# Altium PCB OpenRex_V1I1_PCB.PcbDoc (part 4 of 12)
Units mm, origin at the board's own origin, x right, y up, seen from the top; angles counter-clockwise.
Board outline 70 x 95 mm, 10 copper layers (L1, L2, L3, L4 (PWR), L5 (PWR), L6 (PWR), L7 (PWR), L8, L9, L10), stack 1.632 mm thick; 1080 components, 708 nets, 3831 pads, 2373 vias.
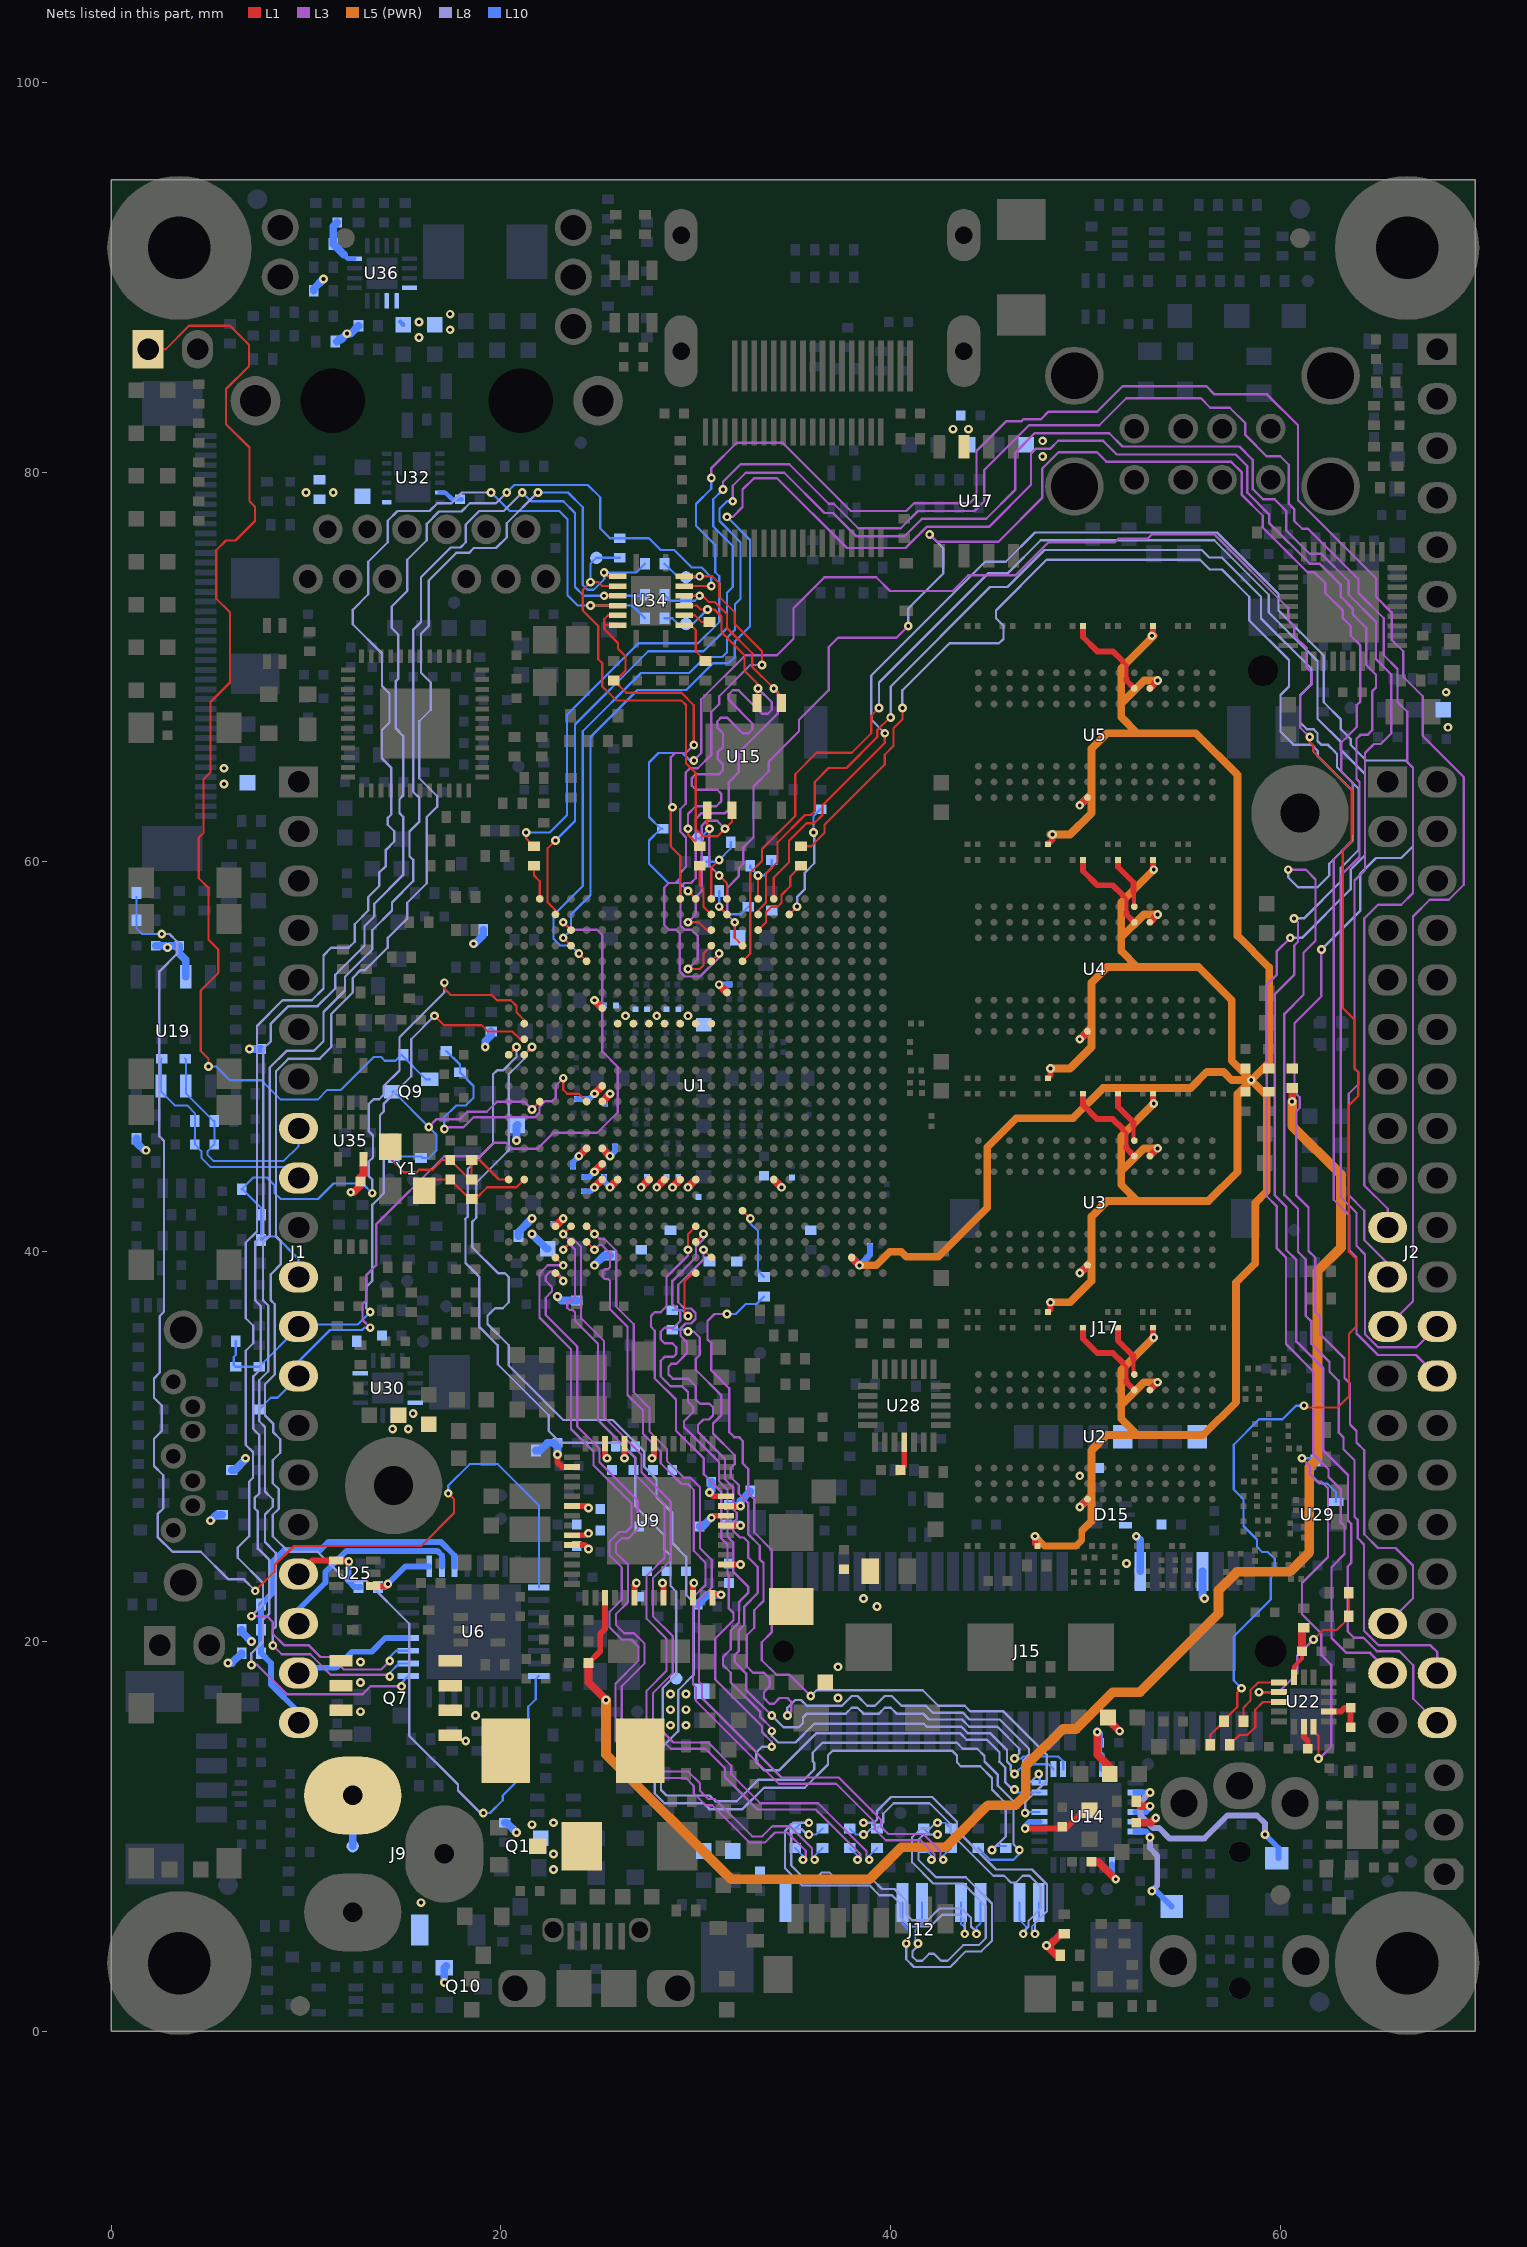
[diagram p12: the nets of this part, all layers, seen from the top]

## Via types
v1: diameter 0.45, hole 0.2, L1 to L10, tented both sides, 2369 vias
v2: diameter 1, hole 0.5, L1 to L10, tented top, 4 vias

## Nets (pads, with @x,y where several pads share a name; then routed paths per layer and width w, separated by ;. In a path a pad name is that pad's centre, name@x,y a point inside that pad or via, vN(x,y) a via of type N, cw(c..) or ccw(c..) an arc to the next point about the centre after c; other vN are vias at no path point) (continued)
+DDR_VREF: C3.1 C4.1 C5.1 C6.1 C7.1 C8.1 C9.1 C10.1 C11.1 C392.2 C393.1 R245.1 R274.2 R345.1 U1.AC2 U2.H1 U2.M8 U3.H1 U3.M8 U4.H1 U4.M8 U5.H1 U5.M8 | length 176.8
  L1 w0.3: v1(47.4,25.4) 47.4,25.035 C4.1@47.535,24.9 ; C5.1@48.065,36.9 48.2,37.035 v1(48.2,37.4) ; C8.1@48.065,48.9 48.2,49.035 v1(48.2,49.4) ; C10.1@48.065,60.9 48.3,61.135 v1(48.3,61.4) ; v1(53.4,71.6) 53.465,71.665 C11.1@53.465,72.1 ; C3.1@53.465,36.1 53.465,35.635 v1(53.5,35.6) ; C6.1@53.465,48.1 53.465,47.635 v1(53.5,47.6) ; C9.1@53.465,60.1 53.465,59.635 v1(53.5,59.6)
  L1 w0.35: v1(49.7,26.9) U2.H1@50.1,27.3 ; v1(49.7,38.9) U3.H1@50.1,39.3 ; v1(49.7,50.9) U4.H1@50.1,51.3 ; v1(49.7,62.9) U5.H1@50.1,63.3 ; U2.M8@53.3,32.9 v1(53.7,33.3) ; U3.M8@53.3,44.9 v1(53.7,45.3) ; U4.M8@53.3,56.9 v1(53.7,57.3) ; U5.M8@53.3,68.9 v1(53.7,69.3)
  L1 w0.4: U1.AC2@38,39.7 v1(38.4,39.3)
  L5 (PWR) w0.35: v1(47.4,25.4) 47.9,24.9 49.507,24.9 49.8,25.193 49.8,25.675 49.825,25.7
  L5 (PWR) w0.4: v1(38.4,39.3) 39.258,39.3 39.958,40 40.54,40 40.8,39.74 42.44,39.74 44.96,42.26 44.96,45.36 46.45,46.85 49.35,46.85 50.9,48.4 55.4,48.4 56.225,49.225 57.075,49.225 57.5,48.8 v1(58.5,48.8) ; v1(48.2,37.4) 49.2,37.4 50.3,38.5 50.3,39.5 ; v1(48.2,49.4) 49.2,49.4 50.3,50.5 50.3,51.5 ; v1@48.2,61.4 49.2,61.4 50.3,62.5 50.3,63.5 ; v1(49.7,26.9) 50.3,27.5 ; v1(49.7,38.9) 50.3,39.5 ; v1(49.7,50.9) 50.3,51.5 ; v1(49.7,62.9) 50.3,63.5 ; 49.825,25.7 50.3,26.175 50.3,27.5 ; v1(53.5,35.6) 51.825,33.925 51.825,32.125 ; v1(53.5,47.6) 51.825,45.925 51.825,44.125 ; v1(53.5,59.6) 51.825,57.925 51.825,56.125 ; v1@53.5,71.6 51.825,69.925 51.825,68.125 ; v1(53.7,33.3) 53,33.3 51.825,32.125 ; v1(53.7,45.3) 53,45.3 51.825,44.125 ; v1(53.7,57.3) 53,57.3 51.825,56.125 ; v1@53.7,69.3 53,69.3 51.825,68.125 ; 50.3,27.5 50.3,29.8 51.1,30.6 52.658,30.6 ; 50.3,39.5 50.3,41.8 51.1,42.6 52.658,42.6 ; 50.3,51.5 50.3,53.8 51.1,54.6 52.658,54.6 ; 50.3,63.5 50.3,65.8 51.1,66.6 52.658,66.6 ; 51.825,32.125 51.825,31.433 52.658,30.6 ; 51.825,44.125 51.825,43.433 52.658,42.6 ; 51.825,56.125 51.825,55.433 52.658,54.6 ; 51.825,68.125 51.825,67.433 52.658,66.6 ; 52.658,30.6 56.042,30.6 57.725,32.283 57.725,38.425 58.7,39.4 58.7,42.5 59.3,43.1 59.3,48 v1(58.5,48.8) ; 52.658,42.6 56.3,42.6 57.8,44.1 57.8,48.1 v1(58.5,48.8) ; 52.658,54.6 55.8,54.6 57.5,52.9 57.5,49.8 v1(58.5,48.8) ; 52.658,66.6 55.658,66.6 57.8,64.458 57.8,56.2 59.425,54.575 59.425,49.725 v1(58.5,48.8)
  L10 w0.3: v1(38.4,39.3) 38.935,39.835 C7.1@38.935,40.3
+DDR_VREF_PMIC: C339.1 R345.2 U9.31 | length 81.6
  L1 w0.3: C339.1@24.5,18.9 25.1,19.5 25.1,20.4 25.35,20.65 U9.31@25.35,22.25
  L1 w0.4: C339.1@24.5,18.9 24.5,17.9 v1(25.4,17) ; v1(60.6,47.7) R345.2@60.6,48.4
  L5 (PWR) w0.5: v1(25.4,17) 25.4,14.2 31.8,7.8 38.913,7.8 40.557,9.443 42.843,9.443 45,11.6 46.4,11.6 46.925,12.125 46.925,13.606 48.834,15.515 49.515,15.515 51.4,17.4 52.8,17.4 56.825,21.425 56.825,22.625 57.775,23.575 60.475,23.575 61.475,24.575 61.475,28.962 61.9,29.387 61.9,39 63.1,40.2 63.1,43.95 60.6,46.45 v1(60.6,47.7)
+GYRO_VREGD: C403.1 U28.16 | length 1.5
  L1 w0.3: C403.1@40.5,28.8 40.7,29 U28.16@40.7,30.225
+HDMI_VP: C76.1 R27.2 U1.L7 | length 0.6
  L1 w0.4: v1(28,43.3) U1.L7@28.4,43.7
+HDMI_VPH: C77.1 R29.2 U1.M7 | length 0.6
  L1 w0.4: v1(28.8,43.3) U1.M7@29.2,43.7
+LVDS_2V5: C79.1 C208.1 R36.2 U1.V7 | length 0.6
  L1 w0.4: U1.V7@34,43.7 v1(34.4,43.3)
+MPCIE_SIM_PWR: C218.1 D15.3 J15.8 J17.C1 | length 1.4
  L10 w0.4: J15.8@56,23.6 56,22.3 v1(56.1,22.2)
  other v1: 52.1,24
+MPCIE_SIM_VPP: C383.1 J15.16 J17.C6 | length 1.9
  L10 w0.4: v1(52.6,25.4) 52.8,25.2 J15.16@52.8,23.6
  other v1: 49.7,28.5
+NVCC_CSI: C145.1 R76.1 U1.N7 | length 0.6
  L1 w0.4: v1(29.6,43.3) U1.N7@30,43.7
+NVCC_ENET: C155.1 C156.1 R74.1 U1.R19 | length 1.1
  L1 w0.4: v1(31.2,53.7) U1.R19@31.6,53.3
  L10 w0.3: v1(31.2,53.7) C155.1@31.735,53.7
+NVCC_MIPI: C149.1 R78.1 U1.K7 | length 0.6
  L1 w0.4: v1(27.2,43.3) U1.K7@27.6,43.7
+NVCC_RGMII: C152.1 R80.1 U1.G18 | length 2.1
  L1 w0.4: v1(24.8,52.9) U1.G18@25.2,52.5
  L10 w0.3: v1(24.8,52.9) 25.065,52.635 C152.1@25.3,52.635
  L10 w0.4: v1(18.6,55.8) 18.658,55.8 19.1,56.242 R80.1@19.1,56.5
+PCIE_VP: C61.1 R13.2 U1.H7 | length 2.3
  L1 w0.4: v1(25.6,43.3) U1.H7@26,43.7
  L10 w0.3: C61.1@25.3,43.835 25.3,43.6 v1(25.6,43.3)
  L10 w0.4: v1(22.9,37.7) 23.1,37.5 R13.2@23.9,37.5
+PCIE_VPH: C64.1 R14.2 U1.G7 | length 2.4
  L1 w0.4: v1(24.8,43.3) U1.G7@25.2,43.7
  L10 w0.3: C64.1@24.265,43.1 24.6,43.1 v1(24.8,43.3)
  L10 w0.4: R14.2@20.9,40.8 20.9,41 v1(21.6,41.7)
+PCIE_VPTX: C62.1 FB1.2 U1.G8 | length 2.3
  L1 w0.4: v1(24.8,44.1) U1.G8@25.2,44.5
  L10 w0.3: C62.1@24.3,43.835 24.535,43.835 v1(24.8,44.1)
  L10 w0.4: v1(21.6,40.9) 22.35,40.15 FB1.2@22.4,40.15
+PMIC_LICELL: C341.1 U9.42 | length 1.9
  L1 w0.3: U9.42@30.85,22.25 31,22.4 v1(31.3,22.4)
  L10 w0.4: C341.1@30.1,21.9 30.6,22.4 v1(31.3,22.4)
+PMIC_VCORE: C379.1 U9.49 | length 1.5
  L1 w0.3: U9.49@31.55,25.95 v1(32.3,25.95)
  L10 w0.4: C379.1@31.6,26 32.25,26 v1(32.3,25.95)
+PMIC_VCOREREF: C378.1 U9.52 | length 1.5
  L1 w0.3: v1(30.7,27.65) 30.9,27.45 U9.52@31.55,27.45
  L10 w0.4: v1(30.7,27.65) 30.8,27.75 C378.1@30.8,28.2
+PWRON_1V375_OPT: C331.1 R341.2 U9.16 | length 3.1
  L1 w0.3: v1(22.9,29.6) 22.9,29.2 23.15,28.95 U9.16@23.65,28.95
  L10 w0.4: R341.2@21.8,29.8 22,29.8 22.4,30.2 C331.1@22.9,30.2 v1(22.9,29.6)
+SATA_VP: C81.1 R18.2 U1.G13 | length 2.6
  L1 w0.4: v1(24.8,48.1) U1.G13@25.2,48.5
  L10 w0.3: C81.1@23.9,47.835 24.535,47.835 v1(24.8,48.1)
  L10 w0.4: v1(24.8,39.3) 25.3,39.8 R18.2@25.6,39.8
+SATA_VPH: C82.1 R19.2 U1.G12 | length 2.1
  L1 w0.4: U1.G12@25.2,47.7 v1(25.6,48.1)
  L10 w0.3: C82.1@25.335,47.6 25.335,47.835 v1(25.6,48.1)
  L10 w0.4: v1(19.2,50.5) 19.2,50.8 19.5,51.1 R19.2@19.5,51.3
+V_INPUT: J9.1 Q7.1 Q7.2 Q7.3 Q10.2 R100.2 R292.2 TP39.1 | length 4.3
  L10 w0.4: TP39.1@12.4,9.5 J9.1@12.4,12.1 ; v1(17.1,2.5) Q10.2@17.1,3.25 Q10.2@17.2,3.35 ; R292.2@20.2,10.7 20.3,10.7 v1(20.8,10.2)
  other v1: 15.9,6.6 12.8,16.4 12.8,17.9 12.8,18.95
+VCC_CAN: C309.2 C397.1 C423.1 FB43.2 FB44.2 R382.2 U19.3 U35.5 | length 6.5
  L1 w0.4: v1(12.3,43.05) 12.45,43.05 12.785,43.385 12.785,43.8 12.95,43.965 U35.5@12.95,44.75
  L10 w0.4: R382.2@1.3,45.8 1.3,45.6 1.7,45.2 v1(1.8,45.2) ; C397.1@2.3,55.7 2.8,55.7 v1(2.9,55.6) 3,55.7 C309.2@3.5,55.7 3.5,55.3 3.835,54.965 U19.3@3.835,54.1 ; v1(7.1,50.4) FB44.2@7.7,50.4
+VCOREDIG: C377.1 R261.2 U9.51 | length 2.3
  L1 w0.3: U9.51@31.55,26.95 v1(32.3,26.95)
  L10 w0.4: C377.1@31.7,26.95 v1(32.3,26.95) 32.3,27.2 R261.2@32.8,27.7
+VDD_CSI: C278.1 C279.1 FB14.2 J12.15 R52.2 R53.2 | length 2.1
  L1 w0.4: R53.2@48.7,3.9 48.5,3.9 v1(48,4.4) 48.142,4.4 48.725,4.983 48.725,5 R52.2@48.9,5
+VDD_SNVS_CAP: C143.1 U1.G9 | length 1.2
  L1 w0.4: U1.G9@25.2,45.3 v1(25.6,44.9)
  L10 w0.3: v1(25.6,44.9) 25.865,45.165 C143.1@25.865,45.4
+VDDA: C283.1 FB13.1 FB26.1 U14.5 | length 3.2
  L1 w0.4: FB26.1@51.15,16.1 51.15,16 v1(51.75,15.4) ; C283.1@52.6,10.7 53.35,10.7 v1(53.6,10.95)
  L10 w0.3: U14.5@52.55,10.75 U14.5@52.56,10.75 53.4,10.75 v1(53.6,10.95)
+VDDD: C282.1 FB11.1 FB20.2 U14.30 | length 4.4
  L1 w0.4: v1(50.6,15.35) 50.6,14.2 51.25,13.55 FB20.2@51.25,13.2
  L10 w0.3: C282.1@50.7,14.7 50.7,14.3 50.85,14.15 U14.30@50.85,13.46 U14.30@50.85,13.45
  L10 w0.4: v1(50.6,15.35) 50.7,15.25 C282.1@50.7,14.8 C282.1@50.7,14.7
+VDDIO: C281.1 FB12.2 U14.20 | length 4.7
  L1 w0.3: v1(46.9,10.4) 49,10.4 49.95,11.35 FB12.2@50.2,11.35
  L10 w0.3: v1(46.9,10.4) 46.9,10.528 47.122,10.75 U14.20@47.65,10.75
+VDDPU: C130.1 C131.1 C132.1 C133.1 C134.1 C135.1 U1.H17 U1.J17 U1.K17 U1.L17 U1.M17 U1.N17 U1.P17
  other v1: 26.4,52.1 28,52.1 29.6,52.1
+VDDUSB: C68.1 C80.1 U1.F9 | length 2
  L1 w0.4: v1(24,44.9) U1.F9@24.4,45.3
  L10 w0.3: C68.1@23.7,44.365 23.7,44.6 v1(24,44.9)
  L10 w0.4: v1(20.8,45.7) 20.8,46.45 C80.1@20.85,46.5
+VIN_4V2: C335.1 C344.1 C345.1 C346.1 C347.1 C348.1 C349.1 C350.1 C351.1 C367.1 C368.1 C369.1 C370.1 C371.1 C372.1 C373.1 C374.1 C375.1 C381.1 C406.1 C407.1 C427.1 C428.1 C435.1 C436.1 D9.1 L11.1 R203.2 R334.2 R335.2 R354.1 R397.2 R398.2 R403.1 TP38.1 U9.7 U9.10 U9.12 U9.20 U9.23 U9.24 U9.34 U9.37 U9.40 U9.45 U9.50 U30.1 U30.2 U30.16 U36.1 U36.2 U36.16 | length 14.8
  L1 w0.3: U9.24@23.65,24.95 24.3,24.95 v1(24.5,24.75) ; U9.23@23.65,25.45 24.4,25.45 v1(24.5,25.55) ; U9.20@23.75,26.95 24.4,26.95 v1(24.5,26.85) ; U9.12@25.35,30.15 25.35,29.5 v1(25.45,29.4) ; v1(26.35,29.4) U9.10@26.35,30.15 ; U9.34@26.85,22.25 26.85,22.9 v1(26.95,23) ; v1(27.75,29.4) 27.85,29.5 U9.7@27.85,30.15 ; v1(28.3,23) 28.35,22.95 U9.37@28.35,22.25 ; U9.40@29.85,22.25 29.85,22.95 v1(29.9,23) ; v1(30.8,26.35) 30.9,26.45 U9.50@31.55,26.45 ; U9.45@31.55,23.95 v1(32.3,23.95)
  L10 w0.23: C427.1@14.85,87.7 C427.1@15,87.55
  L10 w0.4: v1(5.1,26.2) 5.4,26.5 R335.2@5.7,26.5 ; v1(6,18.9) 6.2,18.9 R203.2@6.7,19.4 R203.2@6.7,19.3 ; R334.2@6.2,28.8 6.358,28.8 6.9,29.342 v1(6.9,29.4) ; R397.2@10.4,89.3 10.4,89.4 v1(10.9,89.9) ; R403.1@11.6,86.7 11.7,86.8 11.8,86.8 v1(12.1,87.1) 12.3,87.1 R398.2@12.7,87.5 ; C375.1@30.2,25.9 30.35,25.9 v1(30.8,26.35)
  other v1: 28.7,15.7 29.5,15.7 28.7,16.5 29.5,16.5 28.7,17.3 29.5,17.3 39.3,21.8 38.6,22.2 14.45,30.9 15.25,30.9 15.5,31.7 10,78.95 11.4,78.95 15.8,86.9 17.4,87.3 15.8,87.7 17.4,88.1
+VIN_5V: C88.1 C252.1 D9.2 FB2.1 FB23.1 FB24.2 FB31.2 FB34.2 FB37.1 Q1.3 Q7.5 Q7.6 Q7.7 Q7.8 R365.2 U17.7 | length 0.9
  L1 w0.4: Q1.3@21.9,9.4 Q1.3@21.9,9.5
  L10 w0.4: R365.2@6.7,20.6 6.7,20.5 v1(7.2,20)
  other v1: 22.7,8.3 22.7,9.1 21.6,10.6 22.7,10.7 18.2,14.9 18.7,16.2 37.3,17.1 37.3,18.7 5.8,64 5.8,64.8 68.6,66.9 68.5,68.7 47.8,80.8 47.8,81.6 43.2,82.2 44,82.2
+VIN_ETH: C239.1 R354.2 R355.2 U32.1
ANALOG_IN_0: J1.17 R282.2 U25.1 | length 4.7
  L1 w0.3: J1.17@9.62,23.46 10.31,24.15 v1@12.25,24.15
  L10 w0.3: v1(12.2,24.1) 12.2,24.049 12.18,24.029 12.18,23.1 12.48,22.8 R282.2@12.8,22.8
ANALOG_IN_0_SW: R282.1 U6.25 U25.4 | length 3.8
  L1 w0.3: U25.4@13.45,22.85 v1@14.15,22.85
  L10 w0.3: R282.1@13.7,22.8 14.05,22.8 v1(14.2,22.95) 15.1,23.85 U6.25@16.325,23.85
ANALOG_IN_1: J1.18 U6.26 | length 10.3
  L10 w0.3: J1.18@9.62,20.92 9.62,21.641 11,23.021 11,23.572 12.078,24.65 16.732,24.65 16.975,24.407 U6.26@16.975,23.85
ANALOG_IN_2: J1.19 U6.20 | length 6.4
  L10 w0.3: J1.19@9.62,18.38 9.89,18.65 11.55,18.65 12.375,19.475 13.375,19.475 14.075,20.175 U6.20@15.25,20.175
ANALOG_IN_3: J1.20 R203.1 R239.2 R365.1 U6.27 | length 19.9
  L10 w0.3: J1.20@9.62,15.84 9.62,16.38 8.2,17.8 8.2,18.9 R203.1@7.7,19.4 R365.1@7.7,20.6 R239.2@7.7,21.9 8.3,22.5 8.3,24.1 8.9,24.7 10.749,24.7 11.159,25.11 16.922,25.11 17.625,24.407 U6.27@17.625,23.85
AUD3_CLK: R206.2 U14.21 | length 43.6
  L3 w0.12: v1(31.6,36.8) 30.956,36.8 30.6,36.444 30.6,35.5 30.8,35.3 30.8,33.9 31.715,32.985 31.715,30.741 31.971,30.485 32.215,30.485 32.415,30.285 32.415,29.129 32.685,28.859 32.685,27.615 33,27.3 33,25.6 33.89,24.71 33.89,20.46 33.39,19.96 33.39,19.04 34.13,18.3 34.8,18.3 v1(35.9,17.2)
  L8 w0.12: v1(35.9,17.2) 36.2,17.5 41.644,17.5 42.444,16.7 43.8,16.7 44.085,16.415 45.785,16.415 48,14.2 48,12.848 46.9,11.748 v1(46.9,11.2)
  L10 w0.114: v1(31.6,36.8) 32.056,36.8 32.571,37.315 33.115,37.315 R206.2@33.5,37.7 ; v1(46.9,11.2) 46.95,11.25 U14.21@47.64,11.25
AUD3_CLK_R: R206.1 U1.T5 | length 3.9
  L1 w0.114: U1.T5@32.4,42.1 v1(32.8,41.7)
  L10 w0.114: v1(32.8,41.7) 32.8,41.444 33.2,41.044 33.2,39 R206.1@33.5,38.7
AUD3_RXD: U1.N3 U14.25 | length 50
  L1 w0.114: U1.N3@30,40.5 v1(30.4,40.9)
  L3 w0.12: v1(30.4,40.9) 30.4,40.644 30.015,40.259 30.015,39.715 28.8,38.5 28.8,37.3 29.2,36.9 29.2,36.444 28.856,36.1 28.4,36.1 28.2,35.9 28.2,35.5 28.4,35.3 28.8,35.3 29,35.1 29,34.756 28.844,34.6 28.4,34.6 28.2,34.4 28.2,33.6 28.7,33.1 29.3,33.1 29.6,32.8 29.6,32.3 29.875,32.025 29.875,31.775 29.4,31.3 29.4,31 31.19,29.21 31.19,28.22 31.625,27.785 31.625,25.385 31.915,25.095 31.915,23.591 32.685,22.821 32.685,22.491 32.215,22.021 32.215,20.975 31.8,20.56 31.8,19.6 31.4,19.2 31.4,18.8 31.8,18.4 31.8,17.9 33.3,16.4 33.3,16.152 33.9,15.552 v1(33.9,15.4)
  L8 w0.12: v1(33.9,15.4) 33.9,15.144 34.229,14.815 35.115,14.815 36.08,15.78 41.7,15.78 41.847,15.633 43.623,15.633 43.956,15.3 45.1,15.3 45.965,14.435 45.965,13.841 46.167,13.639 46.167,13.383 v1(46.35,13.2)
  L10 w0.114: v1(46.35,13.2) 46.85,13.7 48.1,13.7 U14.25@48.35,13.45
AUD3_TXC: R124.2 U14.24 | length 43.9
  L3 w0.12: v1(29.6,35.9) 29.9,35.9 30.2,35.6 30.2,34.7 30,34.5 30,33.946 31.3,32.646 31.3,31.6 30.885,31.185 30.885,30.671 32,29.556 32,29.1 31.8,28.9 31.8,28.43 32.205,28.025 32.205,27.589 32.685,27.109 32.685,25.519 33.287,24.917 33.287,24.212 33.475,24.025 33.475,22.075 33,21.6 33,20.7 32.615,20.315 32.615,18.725 32.94,18.4 33.5,18.4 33.8,18.1 33.8,17.7 33.5,17.4 33.5,17.1 33.8,16.8 34,16.8 34.3,17.1 34.7,17.1 34.9,16.9 34.9,16.4 v1(34.7,16.2)
  L8 w0.12: v1(34.7,16.2) 34.7,16.6 35.1,17 35.4,17 35.7,16.7 37.5,16.7 38,17.2 38.3,17.2 38.8,16.7 39.2,16.7 39.7,17.2 40.06,17.2 40.56,16.7 41.8,16.7 42.16,16.34 43.708,16.34 44.048,16 45.6,16 47.1,14.5 47.1,14.2 46.8,13.9 46.8,12.96 46.96,12.8 47.2,12.8 v1(47.6,13.2)
  L10 w0.114: R124.2@28.8,36 29.5,36 v1(29.6,35.9) ; v1(47.6,13.2) 47.65,13.15 U14.24@47.65,12.75
AUD3_TXC_R: R124.1 U1.N1 | length 3.5
  L1 w0.114: v1(29.6,36.7) 29.415,36.885 29.415,38.459 29.856,38.9 U1.N1@30,38.9
  L10 w0.114: R124.1@28.8,37 29.3,37 v1(29.6,36.7)
AUD3_TXD: U1.P2 U14.26 | length 50
  L1 w0.114: v1(30.4,40.1) U1.P2@30.8,39.7
  L3 w0.12: v1(30.4,40.1) 30.4,39.6 29.1,38.3 29.1,37.4 29.415,37.085 29.759,37.085 29.985,36.859 29.985,36.541 29.759,36.315 29.471,36.315 29.215,36.059 29.215,35.681 29.55,35.346 29.55,34.794 29.006,34.25 28.75,34.25 28.6,34.1 28.6,33.7 28.815,33.485 29.615,33.485 30,33.1 30,32.418 30.218,32.2 30.7,32.2 30.885,32.015 30.885,31.6 30.677,31.393 30.392,31.393 30.115,31.115 30.115,30.741 31.5,29.356 31.5,28.32 31.915,27.905 31.915,26.791 32.1,26.606 32.1,26.294 31.915,26.109 31.915,25.685 32.265,25.335 32.459,25.335 32.7,25.094 32.7,24.3 33.185,23.815 33.185,22.485 32.495,21.795 32.495,20.859 32.2,20.564 32.2,19.5 32,19.3 32,18.944 32.585,18.359 32.585,17.515 v1(33.9,16.2)
  L8 w0.12: v1(33.9,16.2) 34.5,15.6 35.3,15.6 35.5,15.8 35.5,16.1 35.7,16.3 37.7,16.3 38,16.6 38.3,16.6 38.6,16.3 39.4,16.3 39.7,16.6 40,16.6 40.3,16.3 41.66,16.3 41.96,16 43.652,16 44.032,15.62 45.48,15.62 46.6,14.5 46.6,14.25 v1(46.35,14)
  L10 w0.114: v1(46.35,14) 46.7,14 46.8,14.1 48.6,14.1 48.85,13.85 U14.26@48.85,13.45
AUD3_TXFS: U1.N4 U14.23 | length 50.1
  L1 w0.114: v1(29.6,40.1) 29.6,40.9 U1.N4@30,41.3
  L3 w0.12: v1(29.6,40.1) 29.6,39.8 28.5,38.7 28.5,37.2 28.2,36.9 27.9,36.9 27.7,36.7 27.7,36.144 27.9,35.944 27.9,33.5 28.985,32.415 28.985,30.815 30.415,29.385 30.415,28.585 31.3,27.7 31.3,25.3 31.625,24.975 31.625,23.475 31.685,23.415 31.685,21.715 31.935,21.465 31.935,21.091 31,20.156 31,18.056 33.4,15.656 33.4,15.356 33.9,14.856 v1(33.9,14.6)
  L8 w0.12: v1(33.9,14.6) 33.4,14.6 33.1,14.3 33.1,13.8 33.5,13.4 34.3,13.4 36.2,15.3 43.56,15.3 43.9,14.96 44.94,14.96 45.585,14.315 45.585,13.841 45.577,13.833 45.887,13.523 45.887,12.769 46.256,12.4 v1(46.35,12.4)
  L10 w0.114: v1(46.35,12.4) 46.5,12.25 U14.23@47.64,12.25 U14.23@47.65,12.25
AUD_HP_L: C290.1 U14.6 | length 5.3
  L8 w0.3: v1(53.3,9.95) 53.3,9.4 53.675,9.025 53.675,7.475 v1(53.4,7.2)
  L10 w0.3: U14.6@52.55,10.25 U14.6@52.56,10.25 53.1,10.25 53.3,10.05 v1(53.3,9.95) ; v1(53.4,7.2) 53.625,7.2 C290.1@54.425,6.4
AUD_HP_R: C291.1 U14.2 | length 11.7
  L8 w0.3: v1(53.3,12.25) 52.825,11.775 52.825,11.053 53.453,10.425 53.775,10.425 54.3,9.9 56.1,9.9 57.275,11.075 58.797,11.075 59.2,10.672 v1(59.2,10.1)
  L10 w0.3: U14.2@52.55,12.25 v1(53.3,12.25) ; v1(59.2,10.1) 59.9,9.4 C291.1@59.9,8.875
AUD_HP_VGND: R234.1 U14.4 | length 1.7
  L1 w0.4: R234.1@52.6,11.8 52.85,11.55 v1(53.3,11.55)
  L10 w0.3: U14.4@52.55,11.25 U14.4@52.56,11.25 53.1,11.25 53.3,11.45 v1(53.3,11.55)
AUD_VAG: C292.1 U14.10 | length 2.5
  L1 w0.4: C292.1@50.3,8.7 50.65,8.7 v1(51.55,7.8)
  L10 w0.3: U14.10@51.35,8.55 U14.10@51.35,8.54 51.35,8 v1(51.55,7.8)
BOARD_ID_1: R346.2 U1.W24 | length 6.2
  L1 w0.114: U1.W24@34.8,57.3 v1(35.2,57.7)
  L8 w0.12: v1(35.2,57.7) 35.2,58.2 35.6,58.6 35.6,59.444 36.08,59.924 36.08,61.458 v1(36.038,61.5) ; v1@36.08,61.5 v1@36.08,61.558
  L10 w0.114: v1(36.038,61.5) 36.038,62.338 R346.2@36.4,62.7
BOARD_VARIANT_0: R15.1 R166.2 U1.P25 | length 4.1
  L1 w0.114: U1.P25@30.8,58.1 30.8,59.7 v1(31.2,60.1)
  L10 w0.114: R166.2@30.5,60 31.1,60 v1(31.2,60.1) 31.8,60.7 R15.1@31.8,61
BOARD_VARIANT_1: R159.1 R164.2 U1.R24 | length 3.3
  L1 w0.114: v1(31.2,57.7) U1.R24@31.6,57.3
  L10 w0.114: R164.2@31.2,58.5 31.2,57.8 v1(31.2,57.7) 31.585,57.315 31.685,57.315 32.315,57.315 R159.1@32.7,57.7 R159.1@32.8,57.7
BOARD_VARIANT_2: R57.1 R163.2 U1.U25 | length 3.1
  L1 w0.114: U1.U25@33.2,58.1 v1(33.2,59.3)
  L10 w0.114: R57.1@32.8,59.8 32.8,59.7 v1(33.2,59.3) 33.5,59.3 33.9,59.7 R163.2@33.9,60.1
BOOT_MODE0: Q9.3 R58.2 R172.1 U1.C12 | length 13
  L1 w0.114: v1(21.6,47.3) U1.C12@22,47.7
  L3 w0.12: v1(16.3,46.4) 16.7,46.8 17.9,46.8 18.28,47.18 19.28,47.18 19.785,47.685 21.215,47.685 v1(21.6,47.3)
  L10 w0.114: Q9.3@14.45,48.2 14.5,48.2 v1(16.3,46.4) 16.7,46 16.7,45.2 16.3,44.8 16,44.8 15.915,44.885 14.585,44.885 R172.1@14.5,44.8
BOOT_MODE1: R171.1 R175.2 U1.F12 | length 15.2
  L1 w0.114: v1(23.2,48.9) 23.2,48.3 23.4,48.1 24,48.1 U1.F12@24.4,47.7
  L3 w0.12: v1(17.1,46.3) 17.185,46.385 18.085,46.385 18.6,46.9 21.744,46.9 21.985,47.141 21.985,47.429 22.271,47.715 22.63,47.715 22.815,47.9 22.815,48.515 v1(23.2,48.9)
  L10 w0.114: v1(17.1,46.3) 17.1,46.894 17.706,47.5 18.2,47.5 18.6,47.9 18.6,48.5 R175.2@17.9,49.2 17.9,49.6 R171.1@17.2,50.3
BOOT_MODE_HDR: JP2.1 Q9.1 R173.1 | length 60.9
  L1 w0.114: JP2.1@1.9,86.3 2.8,86.3 4,87.5 6.1,87.5 7.085,86.515 7.085,85.441 5.9,84.256 5.9,82.456 7.1,81.256 7.1,78.5 7.385,78.215 7.385,77.485 6.385,76.485 5.9,76.485 5.4,75.985 5.4,73.5 6.1,72.8 6.1,69.2 5.1,68.2 5.1,64.6 4.75,64.25 4.75,61.494 4.5,61.244 4.5,59.156 5,58.656 5,56 5.5,55.5 5.5,54.3 4.6,53.4 4.6,50.3 5,49.9 v1(5,49.5)
  L10 w0.114: v1(5,49.5) 5.4,49.5 6.1,48.8 7.7,48.8 8.7,47.8 10.6,47.8 11.1,48.3 11.8,48.3 13.485,49.985 13.859,49.985 14.044,49.8 14.6,49.8 14.9,50.1 16.15,48.85 Q9.1@16.35,48.85
BTN_OR_USER_LED_4: R390.1 R392.1 U6.1 | length 65.8
  L1 w0.114: v1(7.4,22.6) 8.38,23.58 8.38,23.895 9.385,24.9 15.91,24.9 17.6,26.59 17.6,27.3 v1(17.3,27.6)
  L8 w0.12: v1(2.6,56.3) 3,56.3 3.4,55.9 3.4,55.3 2.48,54.38 2.48,45.92 2.715,45.685 2.715,36.915 2.5,36.7 2.5,33.8 2.2,33.5 2.2,32.5 2.6,32.1 2.6,30.8 2.2,30.4 2.2,29 2.675,28.525 2.675,26.82 2.39,26.535 2.39,25.873 2.39,25.359 3.149,24.6 4.6,24.6 6,23.2 6.8,23.2 v1(7.4,22.6)
  L10 w0.114: R392.1@1.3,58.2 R390.1@1.3,57 1.3,56.6 1.6,56.3 v1(2.6,56.3) ; v1(17.3,27.6) 17.3,28 18.4,29.1 19.844,29.1 21.95,26.994 U6.1@21.95,22.775
CAN_N: C312.1 J1.8 R117.2 R249.1 U19.6 | length 11.7
  L10 w0.1: R117.2@3.8,49.9 3.835,49.865 U19.6@3.835,48.5 3.835,48.135 5.27,46.7 R249.1@5.3,46.7 C312.1@5.3,45.5 4.96,45.16 4.96,44.951 5.251,44.66 8.86,44.66 9.62,45.42 J1.8@9.62,46.32
CAN_P: C311.1 J1.9 R41.2 R246.2 U19.7 | length 11.7
  L10 w0.1: R41.2@2.6,49.9 2.565,49.865 U19.7@2.565,48.5 2.565,48.194 3.259,47.5 3.9,47.5 4.3,47.1 R246.2@4.3,46.7 C311.1@4.3,45.5 4.64,45.16 4.64,44.819 5.119,44.34 9.06,44.34 J1.9@9.62,43.78
CFF: C241.2 U32.11 | length 1.3
  L10 w0.22: C241.2@17.9,78.6 C241.2@18,78.6
  L10 w0.23: U32.11@16.86,78.95 17.15,78.95 17.5,78.6 C241.2@17.9,78.6
COMP_1V375: C411.2 R343.2 U30.8
COMP_3V3_HDR: C433.2 R407.2 U36.8 | length 2.6
  L10 w0.23: 11.95,91.15 12.15,90.95 U36.8@12.49,90.95
  L10 w0.4: C433.2@11.6,92.8 11.4,92.6 R407.2@11.4,91.7 11.95,91.15
COMP_BYP: C390.1 C398.1 U22.2 | length 2.4
  L1 w0.3: U22.2@62.275,16.4 U22.2@62.475,16.4 63.1,16.4 63.3,16.6 C390.1@63.6,16.6 C398.1@63.6,15.6
COMP_C1: C391.1 U22.15 | length 1.2
  L1 w0.3: U22.15@61.2,15.625 61.2,15.1 61.4,14.9 C391.1@61.4,14.5
COMP_CRST: C399.1 R110.2 U22.8 | length 2.7
  L1 w0.2: U22.8@60.7,18.175 60.7,18.72 61.1,19.12 C399.1@61.1,19.5 C399.1@61.1,19.6
  L1 w0.4: C399.1@61.1,19.6 61.1,20.6 R110.2@61.2,20.7
COMP_INT: R240.1 R241.2 R242.2 U1.N25 | length 120
  L1 w0.114: v1(29.6,58.5) U1.N25@30,58.1 ; R242.2@56.4,14.7 56.4,15.2 R241.2@57.1,15.9 57.1,15.956 57.785,16.641 57.785,17.385 v1(58,17.6) ; v1(61.2,32.1) 61.3,32 62.935,32 63.515,32.58 63.515,35.786 63.885,36.156 63.885,39.615 63.504,39.996 63.504,47.504 63.985,47.985 63.985,49.2 63.8,49.385 63.8,51.9 63.2,52.5 63.2,60.6 63.64,61.04 63.64,61.378 63.66,61.398 63.66,63.685 61.685,65.66 61.685,65.944 61.5,66.129 v1(61.5,66.4)
  L3 w0.12: v1(29.9,65.2) 30.285,65.585 30.285,68.341 32.544,70.6 34.166,70.6 35.015,71.449 35.015,73.015 36.6,74.6 39.26,74.6 39.96,73.9 43.18,73.9 43.98,74.7 46.4,74.7 48.1,76.4 51.5,76.4 51.675,76.575 53.175,76.575 53.4,76.8 56.61,76.8 60.4,73.01 60.4,72.4 60.7,72.1 60.7,71.6 61.355,70.945 61.355,69.945 61.6,69.7 61.6,69.11 61.015,68.525 61.015,66.885 v1(61.5,66.4)
  L10 w0.114: R240.1@28.3,61.7 R240.1@28.2,61.7 ; v1(29.6,58.5) 29.185,58.915 28.585,58.915 27.6,59.9 27.6,61.1 R240.1@28.2,61.7 ; v1(29.9,65.2) 29.7,65.2 29.315,65.585 28.085,65.585 27.6,65.1 27.6,62.3 R240.1@28.2,61.7 ; v1(58,17.6) 57.6,18 57.6,20.256 59.5,22.156 59.5,23.285 59.7,23.485 59.7,24.244 59.359,24.585 59.071,24.585 58.8,24.856 58.8,25.228 58.1,25.928 58.1,27.3 57.6,27.8 57.6,30.1 58.9,31.4 60.1,31.4 60.8,32.1 v1(61.2,32.1)
COMP_INT1: R242.1 U22.11 | length 3.8
  L1 w0.114: R242.1@57.4,14.7 57.9,15.2 58.3,15.2 58.7,15.6 58.7,16.5 59.1,16.9 U22.11@59.725,16.9
COMP_INT2: R241.1 U22.9 | length 3.2
  L1 w0.114: R241.1@58.1,15.9 58.1,16.6 58.456,16.956 58.456,17.5 58.856,17.9 U22.9@59.725,17.9
COMP_RST: R310.2 U22.16 U29.4 | length 22.9
  L1 w0.114: U22.16@61.7,15.625 61.7,15.4 61.95,15.15 v1(61.95,14)
  L3 w0.12: v1(61.1,29.4) 61.5,29 61.5,28.6 61.9,28.2 62.1,28.2 62.435,27.865 62.435,24.335 61.1,23 61.1,21.4 62.1,20.4 62.1,19.3 62.6,18.8 62.6,14.6 v1@62,14
  L10 w0.114: v1(61.1,29.4) 61.7,29.4 R310.2@61.8,29.3 61.8,28.894 61.665,28.759 61.665,28.435 62,28.1 62.4,28.1 62.85,27.65 U29.4@62.85,27.15
COMP_SA1: R315.1 R316.1 U22.10 | length 8.8
  L1 w0.114: v1(58.9,17.4) U22.10@59.725,17.4 ; v1(61.7,20.1) 62.196,20.596 62.9,20.596 63.5,21.196 R315.1@63.5,21.3 R316.1@63.5,22.5
  L3 w0.12: v1(58.9,17.4) 59.9,17.4 60.86,18.36 60.86,19.26 v1(61.7,20.1)
CPU_GPIO0: J1.11 R208.1 R210.2 R227.2 U1.B17 | length 32.9
  L1 w0.114: v1(17.1,53.8) 17.1,53.5 17.432,53.168 19.532,53.168 19.8,52.9 20.509,52.9 20.8,52.609 20.8,52.28 21.2,51.88 U1.B17@21.2,51.7
  L8 w0.12: v1(13.4,43) 13.4,43.7 13.215,43.885 13.215,44.615 13.436,44.836 13.436,45.964 13.215,46.185 13.215,47.559 13.471,47.815 13.759,47.815 13.985,48.041 13.985,48.485 14.8,49.3 14.8,51 17.1,53.3 v1(17.1,53.8)
  L10 w0.114: J1.11@9.62,38.7 9.62,39.624 8.459,40.785 7.9,40.785 7.715,40.6 R208.1@7.7,40.6 7.7,40.785 R210.2@7.7,41.9 7.7,42.244 6.744,43.2 R227.2@6.7,43.2 7.3,43.8 8,43.8 8.4,43.4 8.4,43 8.7,42.7 10.615,42.7 11.415,43.5 12.9,43.5 v1(13.4,43)
CPU_GPIO1: J1.12 R209.1 R211.2 R228.2 U1.B16 | length 31.5
  L1 w0.114: v1(16.6,52.1) 17.082,51.617 19.013,51.617 19.33,51.3 20.59,51.3 20.99,50.9 U1.B16@21.2,50.9
  L8 w0.12: v1(13.3,36.9) 13.1,37.1 13.1,38.2 13.4,38.5 13.4,42.4 14,43 14,45.8 13.8,46 13.8,47 14,47.2 14,47.6 15.4,49 15.4,50.9 v1(16.6,52.1)
  L10 w0.114: R209.1@6.4,35.4 6.4,34.7 6.3,34.6 6.3,34.2 R211.2@6.4,34.1 R228.2@7.6,34.1 9.62,36.12 J1.12@9.62,36.16 9.72,36.26 12.66,36.26 v1(13.3,36.9)
CPU_GPIO2: J1.13 R273.2 U1.E23 | length 40.9
  L1 w0.114: v1(23.2,56.9) U1.E23@23.6,56.5
  L3 w0.12: v1(13.3,36.1) 12.9,36.5 12.9,37.3 13.1,37.5 13.1,38.8 13.6,39.3 13.6,41.4 17.1,44.9 18.956,44.9 19.641,45.585 20.255,45.585 20.555,45.285 21.885,45.285 22.7,46.1 24.944,46.1 26,47.156 26,49.478 25.2,50.278 25.2,56.244 24.929,56.515 23.585,56.515 v1(23.2,56.9)
  L10 w0.114: R273.2@7.6,31.9 8.2,32.5 8.544,32.5 9.62,33.576 J1.13@9.62,33.62 9.62,34.364 11.236,35.98 12.88,35.98 13,36.1 v1(13.3,36.1)
CPU_XTALI: C83.1 R20.1 R167.1 U1.A7 Y1.3 | length 9
  L1 w0.114: Y1.3@14.325,45.375 14.325,44.775 15.02,44.08 15.68,44.08 15.8,44.2 16.5,44.2 17,44.7 C83.1@17.4,44.7 18.4,43.7 R167.1@18.5,43.7 R20.1@18.5,44.7 18.9,44.7 19.9,43.7 U1.A7@20.4,43.7
CPU_XTALO: C84.1 R167.2 U1.B7 Y1.1 | length 6.2
  L1 w0.114: Y1.1@16.075,43.125 16.65,43.7 C84.1@17.4,43.7 18.4,42.7 R167.2@18.5,42.7 18.7,42.7 19.3,43.3 20.8,43.3 U1.B7@21.2,43.7
CSI_CLK0_N: R125.1 U1.F4 | length 44.5
  L1 w0.1: U1.F4@24.4,41.3 v1(24.8,40.9)
  L3 w0.11: v1(24.8,40.9) 25.04,40.66 25.303,40.66 25.92,40.043 25.92,37.18 26.82,36.28 26.82,32.78 27.62,31.98 27.62,30.78 28.52,29.88 28.52,29.28 29.4,28.4 29.733,28.4 30.22,27.913 30.22,24.78 30.82,24.18 30.82,22.767 30.17,22.117 30.17,17.93 30.32,17.78 30.32,17.098 34.398,13.02 37.333,13.02 39.5,10.853 39.5,10.5 39.88,10.12 41.673,10.12 42.56,9.233 42.56,8.94 v1(42.7,8.8)
  L10 w0.1: v1(42.7,8.8) 42.7,9 R125.1@43.1,9.4
CSI_CLK0_P: R127.1 U1.F3 | length 44.5
  L1 w0.1: U1.F3@24.4,40.5 v1(24.8,40.1)
  L3 w0.11: v1(24.8,40.1) 25.04,40.34 25.17,40.34 25.6,39.91 25.6,39.2 25.5,39.1 25.325,39.1 25.207,38.982 25.207,38.723 25.33,38.6 25.5,38.6 25.6,38.5 25.6,37.047 26.5,36.147 26.5,32.647 27.3,31.847 27.3,30.647 28.2,29.747 28.2,29.147 29.267,28.08 29.6,28.08 29.9,27.78 29.9,24.647 30.5,24.047 30.5,22.9 29.85,22.25 29.85,17.797 30,17.647 30,16.965 34.265,12.7 37.2,12.7 39.18,10.72 39.18,10.367 39.747,9.8 41.54,9.8 42.24,9.1 42.24,8.94 v1(42.1,8.8)
  L10 w0.1: R127.1@41.7,9.4 42.1,9 v1(42.1,8.8)
CSI_CLK0_R_N: J12.8 R125.2 R126.2 | length 17.8
  L8 w0.11: v1(41.4,4.5) 41.4,4.38 41.12,4.1 41.12,3.833 41.333,3.62 41.62,3.62 41.975,3.975 42.225,3.975 42.58,3.62 42.92,3.62 43.72,4.42 44.52,4.42 44.88,4.78 44.88,6.42 43.72,7.58 42.192,7.58 41.1,8.672 41.1,9.953 41.567,10.42 42.027,10.42 42.307,10.7 v1(42.4,10.7)
  L10 w0.1: v1(41.4,4.5) 41.26,4.64 41.26,5.19 41.6,5.53 J12.8@41.6,6.6 ; v1(42.4,10.7) 42.8,10.7 R126.2@43.1,10.4
CSI_CLK0_R_P: J12.9 R127.2 R128.2 | length 17.8
  L8 w0.11: v1(40.8,4.5) 40.8,3.7 41.2,3.3 43.053,3.3 43.853,4.1 44.653,4.1 45.2,4.647 45.2,6.553 43.853,7.9 42.325,7.9 41.42,8.805 41.42,9.82 41.7,10.1 v1(42.4,10.1)
  L10 w0.1: J12.9@40.6,6.6 40.6,5.53 40.94,5.19 40.94,4.64 v1(40.8,4.5) ; R128.2@41.7,10.4 42,10.1 v1(42.4,10.1)
CSI_D0_N: R33.1 U1.E4 | length 44.5
  L1 w0.1: v1(23.2,40.9) U1.E4@23.6,41.3
  L3 w0.11: v1(23.2,40.9) 23.44,40.66 23.703,40.66 24.12,40.243 24.12,36.58 25.3,35.4 25.3,31.5 27.22,29.58 27.22,28.68 28.72,27.18 28.72,24.167 27.8,23.247 27.8,21.3 28.82,20.28 28.82,18.367 27.8,17.347 27.8,15.878 28.858,14.82 30.633,14.82 31.82,13.633 31.82,13.18 33.3,11.7 36.293,11.7 38.76,9.233 38.76,8.94 v1(38.9,8.8)
  L10 w0.1: v1(38.9,8.8) 38.9,9 R33.1@39.3,9.4
CSI_D0_P: R71.1 U1.E3 | length 44.5
  L1 w0.1: v1(23.2,40.1) U1.E3@23.6,40.5
  L3 w0.11: v1(23.2,40.1) 23.44,40.34 23.57,40.34 23.8,40.11 23.8,37.6 23.7,37.5 23.525,37.5 23.407,37.382 23.407,37.123 23.53,37 23.7,37 23.8,36.9 23.8,36.447 24.98,35.267 24.98,31.367 26.9,29.447 26.9,28.547 28.4,27.047 28.4,24.3 27.48,23.38 27.48,21.167 28.5,20.147 28.5,18.5 27.48,17.48 27.48,15.745 28.725,14.5 30.5,14.5 31.5,13.5 31.5,13.047 33.167,11.38 36.16,11.38 38.44,9.1 38.44,8.94 v1(38.3,8.8)
  L10 w0.1: R71.1@37.9,9.4 38.3,9 v1(38.3,8.8)
CSI_D0_R_N: J12.2 R33.2 R65.2 | length 17.8
  L8 w0.11: v1(38.6,10.7) 39.14,10.7 39.3,10.86 39.3,11.3 40.02,12.02 42.133,12.02 43.4,10.753 43.4,10.3 45.4,8.3 47.253,8.3 48.02,7.533 48.02,6.167 47.4,5.547 v1(47.4,5)
  L10 w0.1: v1(38.6,10.7) 39,10.7 R65.2@39.3,10.4 ; v1(47.4,5) 47.26,5.14 47.26,5.38 47.6,5.72 J12.2@47.6,6.6
CSI_D0_R_P: J12.3 R71.2 R119.2 | length 17.8
  L8 w0.11: v1(38.6,10.1) 38.693,10.1 38.973,10.38 39.273,10.38 39.62,10.727 39.62,11.167 40.153,11.7 42,11.7 43.08,10.62 43.08,10.167 45.267,7.98 45.82,7.98 46.175,7.625 46.425,7.625 46.78,7.98 47.12,7.98 47.7,7.4 47.7,6.3 47.08,5.68 47.08,5.373 46.8,5.093 v1(46.8,5)
  L10 w0.1: R119.2@37.9,10.4 38.2,10.1 v1(38.6,10.1) ; J12.3@46.6,6.6 46.6,5.72 46.94,5.38 46.94,5.14 v1(46.8,5)
CSI_D1_N: R120.1 U1.D1 | length 44.5
  L1 w0.1: U1.D1@22.8,38.9 v1(23.2,38.5)
  L3 w0.11: v1(23.2,38.5) 23.2,38.607 22.827,38.98 22.533,38.98 22.3,38.747 22.3,38.5 22.625,38.175 22.625,37.962 22.3,37.637 22.3,36.753 23.92,35.133 23.92,31.033 25.07,29.883 25.07,29.183 27.02,27.233 27.02,25.767 26.553,25.3 26.2,25.3 25.9,25 25.9,24.553 26.52,23.933 26.52,22.02 25.9,21.4 25.9,20.85 26.33,20.42 26.833,20.42 27.375,19.878 27.375,18.875 26.2,17.7 26.2,15.05 27.93,13.32 29.62,13.32 30.22,12.72 30.22,12.343 30.643,11.92 30.98,11.92 32.9,10 33.41,10 33.93,10.52 34.833,10.52 35.96,9.393 35.96,8.94 v1(36.1,8.8)
  L10 w0.1: v1(36.1,8.8) 36.1,9 R120.1@36.5,9.4
CSI_D1_P: R122.1 U1.D2 | length 44.5
  L1 w0.1: U1.D2@22.8,39.7 v1(23.2,39.3)
  L3 w0.11: v1(23.2,39.3) 22.4,39.3 21.98,38.88 21.98,36.62 23.6,35 23.6,30.9 24.75,29.75 24.75,29.05 26.7,27.1 26.7,25.9 26.42,25.62 26.067,25.62 25.58,25.133 25.58,24.42 26.2,23.8 26.2,22.153 25.58,21.533 25.58,20.717 26.197,20.1 26.7,20.1 27.055,19.745 27.055,19.007 25.88,17.833 25.88,14.917 27.797,13 29.487,13 29.9,12.587 29.9,12.21 30.51,11.6 30.847,11.6 32.767,9.68 33.543,9.68 34.063,10.2 34.7,10.2 35.64,9.26 35.64,8.94 v1(35.5,8.8)
  L10 w0.1: R122.1@35.1,9.4 35.5,9 v1(35.5,8.8)
CSI_D1_R_N: J12.5 R120.2 R121.2 | length 17.7
  L8 w0.11: v1(35.8,10.1) 35.707,10.1 35.427,10.38 35.133,10.38 34.9,10.147 34.9,8.503 35.603,7.8 36.12,7.8 36.475,8.155 36.845,8.155 37.2,7.8 39.053,7.8 39.553,7.3 40.2,7.3 40.82,6.68 40.82,5.98 41.1,5.7 41.9,5.7 42.5,6.3 43.653,6.3 44.12,5.833 44.12,5.38 44.4,5.1 v1(44.4,5)
  L10 w0.1: v1(35.8,10.1) 36.2,10.1 R121.2@36.5,10.4 ; v1(44.4,5) 44.4,5.33 44.6,5.53 J12.5@44.6,6.6
CSI_D1_R_P: J12.6 R122.2 R123.2 | length 17.7
  L8 w0.11: v1(35.8,10.7) 35,10.7 34.58,10.28 34.58,8.37 35.47,7.48 38.92,7.48 39.42,6.98 40.067,6.98 40.5,6.547 40.5,5.847 40.967,5.38 42.033,5.38 42.633,5.98 43.52,5.98 43.8,5.7 v1(43.8,5)
  L10 w0.1: R123.2@35.1,10.4 35.4,10.7 v1(35.8,10.7) ; J12.6@43.6,6.6 43.6,5.53 43.8,5.33 v1(43.8,5)
CSI_GPIO0: R129.1 U1.A15 | length 71.9
  L1 w0.114: U1.A15@20.4,50.1 v1(20.8,50.5)
  L8 w0.12: v1(20.8,50.5) 20.8,49.996 20.104,49.3 19.8,49.3 19.6,49.1 19.6,45.544 18.3,44.244 18.3,41.8 18.167,41.668 18.185,41.65 18.185,39.415 18.9,38.7 18.9,36.13 19.84,35.19 19.84,34.222 22.46,31.602 22.46,30.796 23.056,30.2 26.119,30.2 26.9,29.419 26.9,26.956 28.385,25.471 28.385,24.715 28.7,24.4 28.7,22.856 29,22.556 29,18.3 28.3,17.6 28.3,15.3 27.9,14.9 27.9,12.2 28.4,11.7 30.4,11.7 30.7,11.4 32.4,11.4 33.5,12.5 35.59,12.5 36.785,13.695 36.785,14.159 37.025,14.4 37.5,14.4 43.144,14.4 43.4,14.144 43.4,13.8 43.6,13.6 44.6,13.6 45.2,13 45.2,12.4 45.9,11.7 45.9,10 v1(45.2,9.3)
  L10 w0.114: v1(45.2,9.3) 45.4,9.5 R129.1@45.9,9.5
CSI_GPIO1: R136.1 U1.B15 | length 75.4
  L1 w0.114: U1.B15@21.2,50.1 v1(21.6,50.5)
  L8 w0.12: v1(21.6,50.5) 21.2,50.1 21.2,49.9 20.4,49.1 20.4,45.2 18.735,43.535 18.735,41.735 18.525,41.525 18.525,40.231 19.856,38.9 20.2,38.9 20.4,38.7 20.4,37.4 20.1,37.1 19.7,37.1 19.315,36.715 19.315,36.285 20.4,35.2 20.4,34.16 23.2,31.36 25.74,31.36 27.365,29.735 27.365,28.954 27.988,28.332 27.988,27.407 28.8,26.594 28.8,25.056 29.515,24.341 29.515,22.385 29.9,22 29.9,18.3 29.1,17.5 29.1,15.4 28.22,14.52 28.22,12.38 28.5,12.1 30.7,12.1 31,11.8 32.1,11.8 33.2,12.9 35.544,12.9 36.085,13.441 36.085,13.759 36,13.844 36,14.3 36.5,14.8 43.4,14.8 43.7,14.5 44.444,14.5 44.815,14.129 44.815,13.841 45.5,13.156 45.5,12.6 46.3,11.8 46.3,9.6 v1(46.6,9.3)
  L10 w0.114: R136.1@44.5,9.4 45.1,8.8 46.3,8.8 46.6,9.1 v1(46.6,9.3)
CSI_REXT: R160.2 U1.D4 | length 1.2
  L1 w0.4: U1.D4@22.8,41.3 v1(23.2,41.7)
  L10 w0.3: R160.2@22.7,41.435 22.935,41.435 v1(23.2,41.7)
CSPI1_CLK: J2.23 R43.2 | length 115.9
  L1 w0.114: v1(21.3,61.5) 21.3,61.2 R43.2@21.7,60.8
  L3 w0.12: v1(30.8,79.7) 30.8,80.2 32.1,81.5 34.456,81.5 37.956,78 40.8,78 41.2,78.4 44.044,78.4 44.4,78.756 44.4,81.08 45.92,82.6 46.7,82.6 46.8,82.7 47.7,82.7 48.1,83.1 50.6,83.1 51.9,84.4 56.2,84.4 56.615,83.985 59.315,83.985 60.9,82.4 60.9,78.555 64.9,74.555 64.9,73.6 65.7,72.8 65.7,71.4 66.3,70.8 66.3,69.5 67.3,68.5 67.3,66.456 69.4,64.356 69.4,58.822 68.638,58.06 67.66,58.06 66.8,57.2 66.8,37.46 J2.23@65.5,36.16
  L10 w0.114: v1(21.3,61.5) 22.5,61.5 23.4,62.4 23.4,67.556 27.059,71.215 30.115,71.215 31.2,72.3 31.2,74.66 31,74.86 31,76.256 30.015,77.241 30.015,78.359 30.8,79.144 v1(30.8,79.7)
CSPI1_CLK_R: R43.1 U1.C25 | length 1.8
  L1 w0.114: R43.1@21.7,59.8 21.7,59.3 22,59 U1.C25@22,58.1
CSPI1_CS0: J2.24 U1.E22 | length 115.4
  L1 w0.114: v1(23.2,56.1) U1.E22@23.6,55.7
  L3 w0.12: v1(31.6,77.7) 31.9,77.7 32.4,78.2 32.4,79.1 32.985,79.685 34.171,79.685 37.756,76.1 40.756,76.1 41.841,77.185 45.041,77.185 47.2,79.344 47.2,80.944 47.456,81.2 48.2,81.2 48.6,81.6 50.9,81.6 51.6,80.9 57.7,80.9 58.298,80.302 58.298,78.942 59.415,77.825 59.415,77.385 61.5,75.3 62,75.3 63.1,74.2 63.1,73.6 63.7,73 63.7,72.7 64.4,72 64.4,70.1 64.9,69.6 64.9,68.944 64.7,68.744 64.7,66.756 64.459,66.515 64.1,66.515 63.9,66.315 63.9,64.252 64.05,64.102 64.05,60.25 63.093,59.293 63.093,42.807 63.9,42 63.9,40.3 64.34,39.86 64.34,35.76 65,35.1 66.98,35.1 J2.24@68.04,36.16
  L10 w0.114: v1(23.2,56.1) 23.6,56.5 23.6,57.3 24.6,58.3 24.6,66.4 27.015,68.815 29.515,68.815 30.885,70.185 31.685,70.185 32,70.5 32,71.3 32.785,72.085 32.785,76.515 v1(31.6,77.7)
CSPI1_CS1: J2.26 U1.T22 | length 100.9
  L1 w0.114: v1(32,56.9) 32,56.1 U1.T22@32.4,55.7
  L3 w0.12: v1(32,56.9) 31.615,57.285 31.615,58.659 32.2,59.244 32.2,59.66 32.44,59.9 32.44,60.74 32.965,61.265 32.965,63.865 33.745,64.645 33.745,65.145 35.3,66.7 35.3,67.29 36.815,68.805 36.815,71.015 37.3,71.5 40.3,71.5 v1(40.9,72.1) ; v1(42,76.8) 42.385,76.415 45.515,76.415 47.77,78.67 47.77,80.17 48.61,81.01 50.59,81.01 51.068,80.532 57.468,80.532 58.018,79.982 58.018,78.826 59.085,77.759 59.085,77.159 61.394,74.85 61.75,74.85 62.3,74.3 62.3,73.8 63.2,72.9 63.2,72.5 63.6,72.1 63.6,71.6 64.1,71.1 64.1,68.229 63.915,68.044 63.915,66.915 63.115,66.115 63.115,64.641 63.7,64.056 63.7,61.1 62.735,60.135 62.735,42.665 63.54,41.86 63.54,40.06 63.9,39.7 63.9,35.804 65.004,34.7 66.96,34.7 J2.26@68.04,33.62
  L8 w0.12: v1(40.9,72.1) 40.9,73 42.7,74.8 42.7,76.1 v1(42,76.8)
CSPI1_MISO: J2.21 U1.F21 | length 112.1
  L1 w0.114: v1(24,55.3) U1.F21@24.4,54.9
  L3 w0.12: v1(31.9,78.5) 31.9,79.3 32.565,79.965 34.535,79.965 36.6,77.9 37.044,77.9 38.244,76.7 40.7,76.7 41.6,77.6 44.9,77.6 46.4,79.1 46.4,81 47.385,81.985 51.215,81.985 51.892,81.308 57.892,81.308 58.578,80.622 58.578,79.122 59.1,78.6 59.7,78.6 60.3,78 60.3,77 61.5,75.8 62.1,75.8 63.5,74.4 63.5,73.7 64.9,72.3 64.9,70.4 65.685,69.615 65.685,66.585 65.144,66.044 64.8,66.044 64.34,65.584 64.34,59.584 63.8,59.044 63.8,49.4 63.985,49.215 63.985,48.585 63.5,48.1 63.5,42.9 64.3,42.1 64.3,40.6 65.5,39.4 J2.21@65.5,38.7
  L10 w0.114: v1(24,55.3) 23.585,55.715 23.041,55.715 22.7,56.056 22.7,57.256 24.2,58.756 24.2,66.7 27.185,69.685 29.67,69.685 30.5,70.515 31.359,70.515 31.6,70.756 31.6,71.5 32.015,71.915 32.015,73.215 32.3,73.5 32.3,76.4 31.215,77.485 31.215,78.115 31.6,78.5 v1(31.9,78.5)
CSPI1_MOSI: J2.19 U1.D24 | length 109
  L1 w0.114: U1.D24@22.8,57.3 22.8,57.51 22.4,57.91 22.4,60.7 v1(22.8,61.1)
  L3 w0.12: v1(31.4,79.1) 31.4,79.5 32.3,80.4 34.8,80.4 36.822,78.378 37.078,78.378 38.341,77.115 40.515,77.115 41.4,78 44.3,78 44.8,78.5 44.8,80.1 47.1,82.4 50.7,82.4 52.085,83.785 55.915,83.785 56.4,83.3 57.4,83.3 58.2,82.5 58.2,81.9 59.29,80.81 59.99,80.81 60.422,80.378 60.422,78.378 60.7,78.1 60.7,77.5 61.115,77.085 61.415,77.085 64,74.5 64,73.8 65.3,72.5 65.3,70.6 66,69.9 66,68.2 66.5,67.7 66.5,65.126 66.8,64.826 66.8,58.4 66.2,57.8 65,57.8 64.3,57.1 64.3,43.4 65.5,42.2 J2.19@65.5,41.24
  L10 w0.114: v1(22.8,61.1) 23.8,62.1 23.8,67.044 27.556,70.8 30.4,70.8 31.6,72 31.6,73.8 31.9,74.1 31.9,76.2 30.9,77.2 30.9,78.6 v1(31.4,79.1)
CSPI2_CLK: J2.38 R130.2 | length 101.9
  L1 w0.114: R130.2@35.4,60.8 35.919,60.8 36.61,61.49 36.61,61.91 39.7,65 39.7,65.5 40.15,65.95 40.15,66.85 40.6,67.3 v1(40.6,67.9)
  L3 w0.12: v1(60.4,59.6) 61.3,59.6 61.8,59.1 61.8,55.956 61.18,55.336 61.18,53.18 60.2,52.2 60.2,42.9 60.9,42.2 60.9,40 61.3,39.6 61.3,36.7 61.585,36.415 61.585,35.271 62.515,34.341 62.515,33.841 62.985,33.371 62.985,30.715 63.235,30.465 63.235,29.865 63.8,29.3 63.8,26.4 63.962,26.238 63.962,25.303 64.285,24.98 64.285,20.555 65.04,19.8 67.7,19.8 68.04,19.46 J2.38@68.04,18.38
  L8 w0.12: v1(40.6,67.9) 40.6,68.8 43.015,71.215 45.559,71.215 45.785,71.441 45.785,72.115 45.4,72.5 45.4,72.9 48,75.5 55.87,75.5 56.37,75 57,75 58.4,73.6 58.4,72.388 60.435,70.353 60.435,69 60,68.565 60,66.675 60.66,66.015 61.585,66.015 61.915,65.685 61.915,65.43 63.7,63.645 63.7,61.1 62.5,59.9 62.5,59.3 61.9,58.7 60.9,58.7 60.4,59.2 v1(60.4,59.6)
CSPI2_CLK_R: R130.1 U1.U23 | length 4.4
  L1 w0.114: U1.U23@33.2,56.5 33.6,56.9 33.6,57.409 33.891,57.7 34.2,57.7 34.4,57.9 34.4,58.3 34.85,58.75 34.85,59.25 R130.1@35.4,59.8
CSPI2_CS0: J2.35 U1.V25 | length 103.5
  L1 w0.114: U1.V25@34,58.1 34,59.2 34.785,59.985 34.785,61.085 35.685,61.985 36.085,61.985 36.5,62.4 36.5,62.9 39.7,66.1 v1(39.7,66.6)
  L3 w0.12: v1(62.1,55.5) 62.1,53.1 60.715,51.715 60.715,48.185 60.985,47.915 60.985,47.385 60.815,47.215 60.815,42.885 61.44,42.26 61.44,40.041 61.78,39.701 61.78,36.92 62.028,36.672 62.028,35.772 63.285,34.515 63.285,33.515 63.565,33.235 63.565,31.135 63.9,30.8 63.9,30.215 64.3,29.815 64.3,25.5 65,24.8 65.9,24.8 66.8,23.9 66.8,22.22 J2.35@65.5,20.92
  L8 w0.12: v1(39.7,66.6) 39,67.3 39,69.556 44.844,75.4 45.9,75.4 47.4,76.9 56.74,76.9 59.9,73.74 59.9,72.9 62.215,70.585 62.215,68.185 63.1,67.3 63.1,66.8 63.6,66.3 63.6,66 64.4,65.2 66.426,65.2 66.8,64.826 66.8,60.8 66.2,60.2 64.9,60.2 64.1,59.4 64.1,57.5 v1(62.1,55.5) ; v1@62,55.5 v1@62.05,55.55
CSPI2_MISO: J2.40 U1.U24 | length 105.7
  L1 w0.114: U1.U24@33.2,57.3 33.2,57.5 33.6,57.9 33.6,59.4 34.2,60 34.2,61 35.6,62.4 35.9,62.4 36.1,62.6 36.1,64.1 36.815,64.815 37.73,64.815 39.315,66.4 39.315,66.759 39.956,67.4 v1(40,67.4)
  L3 w0.12: v1(60.7,57.1) 60.9,56.9 60.9,55.9 60.7,55.7 60.7,54.2 59.7,53.2 59.7,42.908 60.289,42.319 60.289,40.1 60.815,39.574 60.815,35.385 62.2,34 62.2,29.8 63.46,28.54 63.46,26.205 63.623,26.042 63.623,24.023 63.447,23.847 63.447,20.508 63.756,20.2 64.244,20.2 64.944,19.5 66.1,19.5 66.815,18.785 66.815,17.065 J2.40@68.04,15.84
  L8 w0.12: v1(40,67.4) 40,69 45.1,74.1 46,74.1 47.9,76 55.956,76 56.341,75.615 56.985,75.615 59,73.6 59,72.49 61.585,69.905 61.585,69.125 61,68.54 61,67.156 61.356,66.8 61.7,66.8 61.9,66.6 61.9,66.2 62.1,66 62.444,66 62.81,65.634 62.81,65.624 62.9,65.534 62.9,64.856 64.02,63.736 64.02,60.62 63.1,59.7 63.1,59 61.2,57.1 v1(60.7,57.1)
CSPI2_MOSI: J2.37 U1.T21 | length 106.1
  L1 w0.114: U1.T21@32.4,54.9 32.8,55.3 32.8,59.444 33.4,60.044 33.4,60.656 35.1,62.356 35.1,64.5 36.2,65.6 38,65.6 39,66.6 39,67.5 v1(39.4,67.9)
  L3 w0.12: v1(60.5,56.1) 59.8,55.4 59.8,54.2 59.3,53.7 59.3,42.844 59.8,42.344 59.8,40.193 60.285,39.708 60.285,35.259 61.675,33.869 61.675,29.625 62.465,28.835 62.465,28.435 63.1,27.8 63.1,26.1 63.285,25.915 63.285,24.481 62.615,23.811 62.615,20.185 63.385,19.415 64.6,19.415 65.5,18.515 J2.37@65.5,18.38
  L8 w0.12: v1(39.4,67.9) 39.4,69.2 45,74.8 46,74.8 47.7,76.5 56.6,76.5 59.4,73.7 59.4,72.8 61.9,70.3 61.9,67.344 63.1,66.144 63.1,65.744 64.34,64.504 64.34,60.34 63.6,59.6 63.6,58.6 61.1,56.1 v1(60.5,56.1)
CSPI3_1DIR: R360.1 U34.2 | length 2.5
  L1 w0.114: U34.2@29.4,72.15 29.75,72.15 30,71.9 30,70.8 R360.1@30.5,70.3
CSPI3_2DIR: R359.1 U34.3 | length 1.4
  L1 w0.114: U34.3@29.4,72.65 29.95,72.65 30.3,72.3 R359.1@30.7,72.3
CSPI3_CLK: R131.2 R361.2 TP24.1 U15.6 U34.4 | length 29.8
  L1 w0.114: U34.4@29.4,73.15 30.05,73.15 30.25,72.95 v1(30.6,72.95) 30.958,72.95 31.32,72.588 31.32,71.78 32.5,70.6 32.5,69.8 33.2,69.1 v1(33.2,68.9) 33.135,68.835 U15.6@33.135,68.15 ; v1(29.6,61.7) 29.6,61.4 R131.2@30.2,60.8
  L3 w0.12: v1(29.6,61.7) 29.6,62.456 30,62.856 31.056,62.856 31.3,63.1 31.3,63.5 31.1,63.7 30,63.7 29.8,63.9 29.8,64.3 30,64.5 31.2,64.5 31.4,64.7 31.4,65 31.12,65.28 31.12,65.62 31.4,65.9 31.4,66.6 31.1,66.9 31.1,67.2 31.3,67.4 31.6,67.4 32.4,66.6 32.7,66.6 32.9,66.8 32.9,67.1 31.7,68.3 31.7,68.6 31.9,68.8 32.2,68.8 33.4,67.6 33.7,67.6 33.9,67.8 33.9,68.2 v1(33.2,68.9)
  L10 w0.114: R361.2@28.4,72.5 28.8,72.5 29.1,72.2 TP24.1@29.5,72.2 29.85,72.2 v1(30.6,72.95)
CSPI3_CLK_R: R131.1 U1.P24 | length 2.7
  L1 w0.114: R131.1@30.2,59.8 30.2,58.783 30.4,58.583 30.4,57.7 U1.P24@30.8,57.3
CSPI3_CS0: R364.2 TP25.1 U1.P21 U34.7 | length 31.9
  L1 w0.114: U34.7@29.4,74.65 v1(30.2,74.65) 30.85,74.65 31.2,74.3 31.2,73.6 32,72.8 32,72.2 33.4,70.8 v1(33.4,70.1) ; U1.P21@30.8,54.9 v1(31.2,55.3)
  L3 w0.12: v1(31.2,55.3) 31.2,55.1 30.215,54.115 29.441,54.115 29.185,54.371 29.185,56.315 28.985,56.515 28.641,56.515 28.385,56.771 28.385,58.685 28.615,58.915 28.959,58.915 29.215,59.171 29.215,59.459 29.5,59.744 29.5,61.256 29.2,61.556 29.2,62.7 29.485,62.985 29.485,64.585 29.7,64.8 30.1,64.8 30.8,65.5 30.8,67.7 31.2,68.1 31.2,68.5 32.8,70.1 v1(33.4,70.1)
  L10 w0.114: R364.2@28.4,75.3 29.1,74.6 TP25.1@29.5,74.6 30.15,74.6 v1(30.2,74.65) v1@30.175,74.65
CSPI3_CS2: TP28.1 U1.R25 U15.1 | length 5.8
  L1 w0.114: U15.1@30.595,62.65 30.595,61.805 v1(30.7,61.7) ; v1(31.2,59.3) 31.6,58.9 U1.R25@31.6,58.1
  L3 w0.12: v1(30.7,61.7) 30.7,59.8 v1(31.2,59.3)
  L10 w0.114: TP28.1@30.1,61.2 30.2,61.2 v1(30.7,61.7)
CSPI3_MCU_CLK: R361.1 U6.19 U34.13 | length 94.7
  L1 w0.114: v1(24.6,73.15) U34.13@26,73.15
  L3 w0.12: v1(7.2,21.3) 8,21.3 8.3,21 8.3,20.4 8.9,19.8 10.154,19.8 10.754,19.2 11.3,19.2 11.935,18.565 13.865,18.565 v1(14.3,19)
  L8 w0.12: v1(7.2,21.3) 7.8,21.9 7.8,23 6.5,24.3 6.5,24.815 7.085,25.4 7.085,28.2 7.285,28.4 7.285,29.715 6.915,30.085 6.915,34.915 7.3,35.3 7.3,36.2 6.915,36.585 6.915,40.471 7.485,41.041 7.485,51.585 8.8,52.9 10.3,52.9 10.9,53.5 10.9,55.2 11.3,55.6 12.2,55.6 12.5,55.9 12.5,56.8 13.2,57.5 13.2,58.2 13.765,58.765 13.765,59.459 14.1,59.794 14.1,60.615 14.535,61.05 14.535,61.565 14.2,61.9 14.2,62.256 14.385,62.441 14.385,64.815 13.9,65.3 13.9,66.756 14.285,67.141 14.285,68.643 13.9,69.028 13.9,70.694 12.4,72.194 12.4,72.928 13.2,73.728 13.2,75.4 14.2,76.4 14.2,77.5 14.7,78 16.345,78 16.745,78.4 17.461,78.4 18.011,78.95 v1(19.5,78.95)
  L10 w0.114: v1(14.3,19) 14.3,19.2 14.625,19.525 U6.19@15.25,19.525 ; v1(19.5,78.95) 20.45,78 23,78 23.42,77.58 23.42,73.68 23.95,73.15 v1(24.6,73.15) 26.75,73.15 R361.1@27.4,72.5
CSPI3_MCU_CS0: R364.1 U6.8 U34.10 | length 103.8
  L1 w0.114: v1(25.3,74.85) 25.5,74.65 U34.10@26,74.65
  L8 w0.12: v1(19.1,11.2) 18.956,11.2 17.8,12.356 17.8,12.656 15.3,15.156 15.3,20.91 13.11,23.1 12.1,23.1 10.6,24.6 9.1,24.6 8.3,25.4 8.3,26.5 8.6,26.8 8.6,27.82 8.3,28.12 8.3,29.3 8.685,29.685 8.685,30.375 8.315,30.745 8.315,31.185 7.9,31.6 7.9,33.2 8.4,33.7 8.4,37.3 8.2,37.5 8.2,38.838 8.7,39.338 8.7,40.544 8.46,40.784 8.46,49.26 9.1,49.9 10.7,49.9 11.3,50.5 11.3,52.194 12.4,53.294 12.4,54.044 12.8,54.444 13.044,54.444 14.2,55.6 14.2,56.1 15.2,57.1 15.2,57.9 16.2,58.9 16.2,62.3 16.735,62.835 16.735,63.365 15.815,64.285 15.815,67.215 16.4,67.8 16.4,69.2 15.9,69.7 15.9,71.7 16.3,72.1 16.3,74.437 17.714,75.851 18.365,75.851 18.614,76.1 19.755,76.1 20.3,76.645 20.3,77.377 21.873,78.95 v1(21.9,78.95)
  L10 w0.114: v1(19.1,11.2) 19.444,11.2 20.1,11.856 20.1,12.1 21.4,13.4 21.4,16.656 21.785,17.041 21.785,18.06 U6.8@21.95,18.225 ; v1(21.9,78.95) 23.45,78.95 24.2,78.2 24.2,74.206 24.441,73.965 24.759,73.965 25.3,74.506 v1(25.3,74.85) 26.95,74.85 R364.1@27.4,75.3
CSPI3_MCU_ENN: R319.1 U1.M25 U34.14 U34.15 | length 21
  L1 w0.114: U34.15@26,72.15 25.3,72.15 ; U34.14@26,72.65 25.5,72.65 25.3,72.45 25.3,72.15 ; v1(28.8,62.8) 28.715,62.715 28.715,60.785 29.2,60.3 U1.M25@29.2,58.1 ; v1(29.9,66) 29.9,68.04 29.267,68.674 26.426,68.674 R319.1@25.8,69.3 25.9,69.3 26.4,69.8 26.4,70.556 26.015,70.941 26.015,71.229 25.3,71.944 25.3,72.15
  L3 w0.12: v1(28.8,62.8) 28.715,62.885 28.715,65.359 28.941,65.585 29.485,65.585 v1(29.9,66)
CSPI3_MCU_MISO: R363.1 U6.17 U34.6 | length 94.3
  L1 w0.114: U34.6@29.4,74.15 v1(30.8,74.15)
  L3 w0.12: v1(7.2,18.8) 7.5,18.8 9,17.3 12.914,17.3 13.314,17.7 v1(14.9,17.7)
  L8 w0.12: v1(7.2,18.8) 7.2,19.4 7.8,20 7.8,21.12 8.122,21.442 8.122,24.178 7.535,24.765 7.535,26.665 7.365,26.835 7.365,27.365 7.6,27.6 7.6,30.6 7.3,30.9 7.3,33.6 7.685,33.985 7.685,37.207 7.4,37.492 7.4,40.5 7.81,40.91 7.81,50.41 8.2,50.8 8.2,51.7 9.1,52.6 10.6,52.6 11.5,53.5 11.5,54.2 13,55.7 13,56.7 13.5,57.2 13.5,57.844 14.985,59.329 14.985,62.315 14.8,62.5 14.8,63.215 14.985,63.4 14.985,66.471 14.615,66.841 14.615,69.28 14.735,69.4 14.735,71.665 14.4,72 14.4,73.1 15.2,73.9 15.2,75.5 16.2,76.5 16.2,77.341 16.834,77.975 17.975,77.975 18.4,78.4 19.75,78.4 v1(20.3,78.95)
  L10 w0.114: v1(14.9,17.7) 14.9,17.875 U6.17@15.25,18.225 ; v1(20.3,78.95) 20.685,79.335 24.465,79.335 25.1,78.7 25.1,77.1 25.6,76.6 R363.1@26.1,76.6 27.6,76.6 28.2,76 28.9,76 29.8,75.1 30.3,75.1 30.8,74.6 v1(30.8,74.15)
CSPI3_MCU_MOSI: R362.1 U6.18 U34.12 | length 87.4
  L1 w0.114: v1(25.3,73.65) U34.12@26,73.65
  L3 w0.12: v1(8.3,19.8) 8.76,19.34 10.218,19.34 11.273,18.285 14.215,18.285 v1(14.3,18.2)
  L8 w0.12: v1(8.3,19.8) 8.3,20.6 8.445,20.745 8.445,24.555 7.9,25.1 7.9,26.515 8.3,26.915 8.3,27.3 7.9,27.7 7.9,31 7.6,31.3 7.6,33.4 8.065,33.865 8.065,37.239 7.792,37.512 7.792,40.466 8.135,40.809 8.135,49.435 9,50.3 10.4,50.3 10.9,50.8 10.9,52.3 12,53.4 12,54.1 13.4,55.5 13.4,56.489 14.415,57.504 14.415,57.915 15.5,59 15.5,60.106 15.315,60.291 15.315,61.559 15.82,62.064 15.82,63.28 15.5,63.6 15.5,71.9 15.9,72.3 15.9,74.6 17.431,76.131 17.931,76.131 18.2,76.4 18.2,77.309 18.891,78 20.15,78 v1(21.1,78.95)
  L10 w0.114: v1(14.3,18.2) 14.3,18.4 14.775,18.875 U6.18@15.25,18.875 ; v1(21.1,78.95) 21.55,78.5 23.2,78.5 23.8,77.9 23.8,74.1 24.25,73.65 v1(25.3,73.65) 27.35,73.65 R362.1@27.4,73.7
CSPI3_MISO: R363.2 TP23.1 U1.P23 U15.2 U34.11 | length 32.2
  L1 w0.114: U34.11@26,74.15 25.2,74.15 25,74.35 v1(24.6,74.35) 24.2,73.95 24.2,72.9 25,72.1 25,70.4 25.2,70.2 25.2,69 25.915,68.285 29.259,68.285 29.5,68.044 29.5,65.056 30,64.556 30,61.7 30.385,61.315 31.115,61.315 v1(31.5,61.7) 31.865,62.065 U15.2@31.865,62.65 ; v1(29.6,56.9) 30.16,56.9 30.56,56.5 U1.P23@30.8,56.5
  L3 w0.12: v1(29.6,56.9) 30,57.3 30,58.2 30.315,58.515 30.315,61.859 30.556,62.1 31.1,62.1 v1(31.5,61.7)
  L10 w0.114: v1(24.6,74.35) 24.6,75.3 TP23.1@24.9,75.6 R363.2@26.1,75.6
CSPI3_MOSI: R362.2 TP22.1 U1.P22 U15.5 U34.5 | length 30.6
  L1 w0.114: U34.5@29.4,73.65 30.35,73.65 30.665,73.335 30.969,73.335 31.6,72.704 31.6,72 32.9,70.7 32.9,70 v1(34,68.9) 34.405,68.495 U15.5@34.405,68.15 ; v1(29.6,54.5) 30.2,54.5 30.4,54.7 30.4,55.3 U1.P22@30.8,55.7
  L3 w0.12: v1(29.6,54.5) 30.1,55 30.1,56.2 29.785,56.515 29.441,56.515 29.215,56.741 29.215,58.715 29.415,58.915 29.759,58.915 30,59.156 30,62.2 30.3,62.5 31.5,62.5 31.7,62.7 31.7,64.1 32.2,64.6 32.2,65.6 34.2,67.6 34.2,68.7 v1(34,68.9)
  L10 w0.114: R362.2@28.4,73.7 28.7,73.4 TP22.1@29.5,73.4 29.95,73.4 v1(30.2,73.65)
DRAM0_ZQ: R4.2 U2.L8 | length 4.8
  L1 w0.19: 51.9,34.3 52.1,34.1 52.1,33.4
  L1 w0.3: R4.2@49.865,36.1 49.865,35.535 50.6,34.8 51.4,34.8 51.9,34.3 ; 52.1,33.4 52.1,33.3 U2.L8@52.5,32.9
DRAM0_ZQ1: R306.2 U2.L9 | length 2.7
  L1 w0.19: 52.46,34.46 52.46,33.74 U2.L9@52.5,33.7
  L1 w0.3: R306.2@51.665,36.1 51.665,35.435 52.46,34.64 52.46,34.46
DRAM1_ZQ: R5.2 U3.L8 | length 4.8
  L1 w0.19: 51.9,46.3 52.1,46.1 52.1,45.4
  L1 w0.3: R5.2@49.865,48.1 49.865,47.535 50.6,46.8 51.4,46.8 51.9,46.3 ; 52.1,45.4 52.1,45.3 U3.L8@52.5,44.9
DRAM1_ZQ1: R307.2 U3.L9 | length 2.7
  L1 w0.19: 52.46,46.46 52.46,45.74 U3.L9@52.5,45.7
  L1 w0.3: R307.2@51.665,48.1 51.665,47.435 52.46,46.64 52.46,46.46
DRAM2_ZQ: R8.2 U4.L8 | length 4.8
  L1 w0.19: 51.9,58.3 52.1,58.1 52.1,57.4
  L1 w0.3: R8.2@49.865,60.1 49.865,59.535 50.6,58.8 51.4,58.8 51.9,58.3 ; 52.1,57.4 52.1,57.3 U4.L8@52.5,56.9
DRAM2_ZQ1: R308.2 U4.L9 | length 2.7
  L1 w0.19: 52.46,58.46 52.48,58.44 52.48,57.72 U4.L9@52.5,57.7
  L1 w0.3: R308.2@51.665,60.1 51.665,59.735 52.46,58.94 52.46,58.46
DRAM3_ZQ: R9.2 U5.L8 | length 4.8
  L1 w0.19: 51.9,70.3 52.1,70.1 52.1,69.4
  L1 w0.3: R9.2@49.865,72.1 49.865,71.535 50.6,70.8 51.4,70.8 51.9,70.3 ; 52.1,69.4 52.1,69.3 U5.L8@52.5,68.9